# Altium PCB AC Voltage Controller.PcbDoc
Units mil, origin at the board's own origin, x right, y up, seen from the top; angles counter-clockwise.
Board outline 6040 x 4060 mil, 2 copper layers (L1, L4), stack 52.559 mil thick; 50 components, 37 nets, 228 pads, 75 vias.
Unrouted connection lines stored in the file: 4.
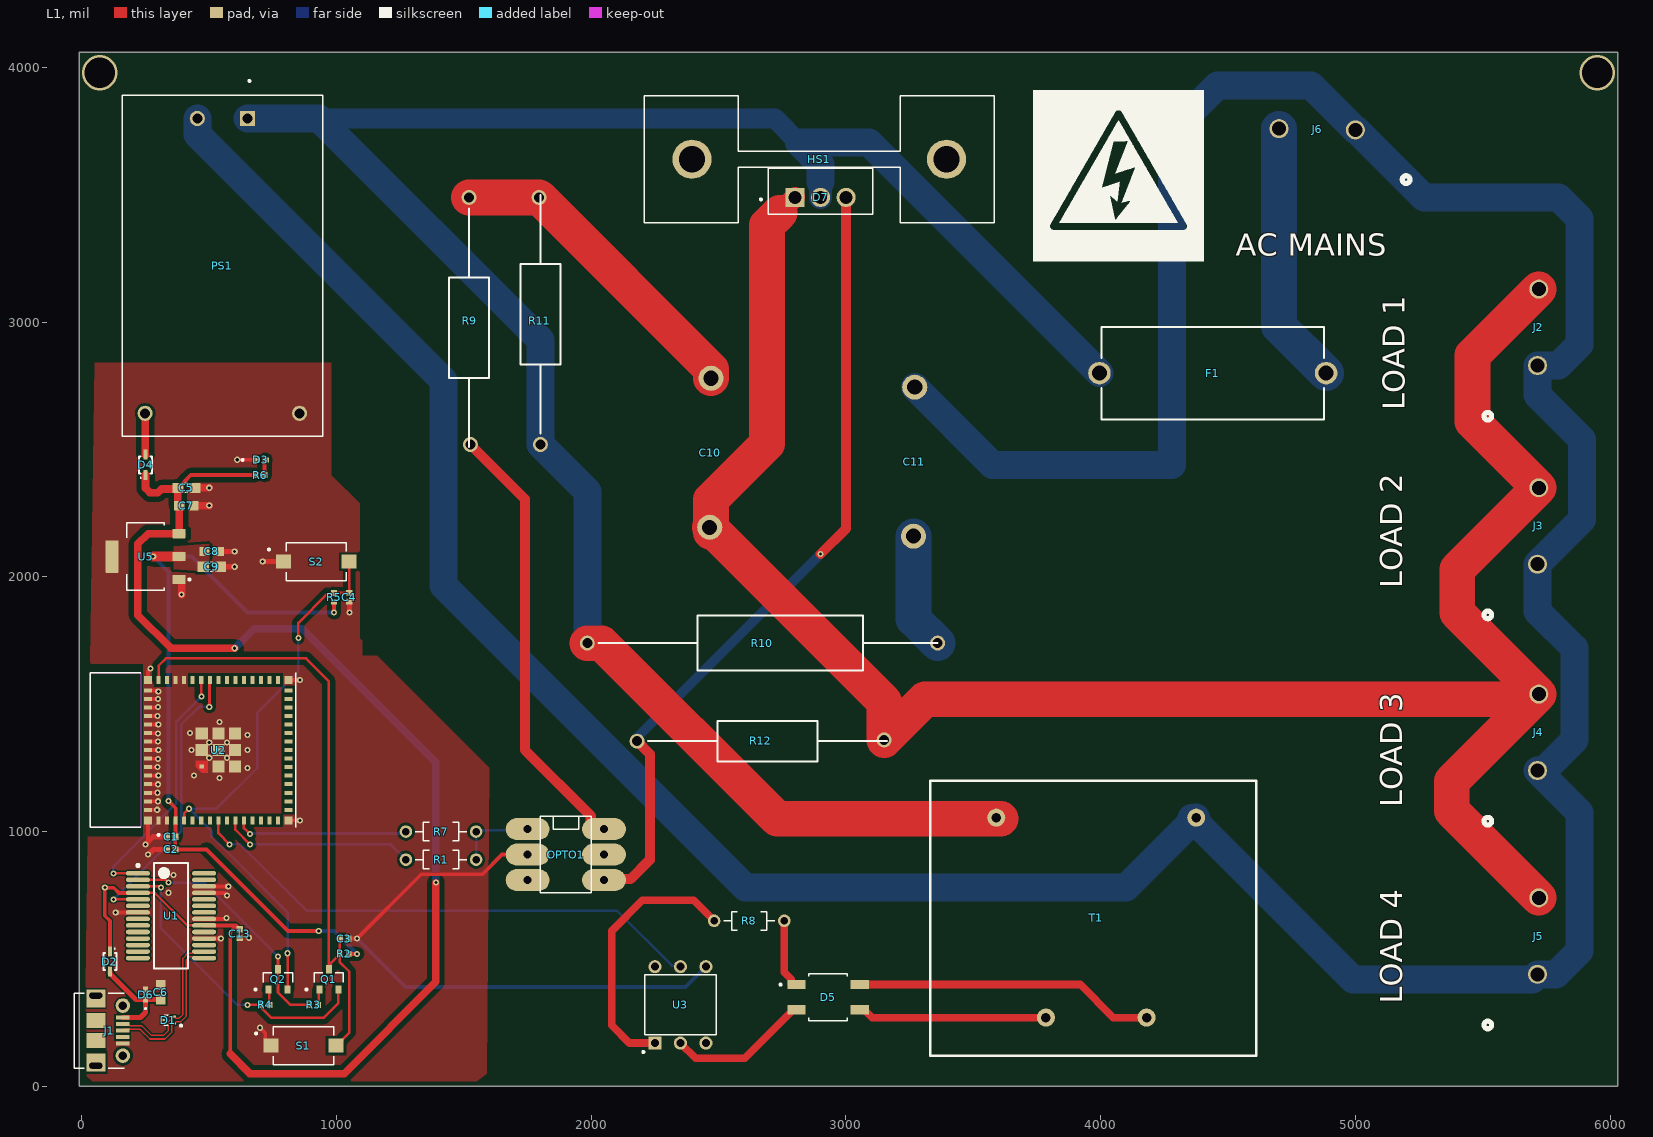
[diagram p0: L1 view]
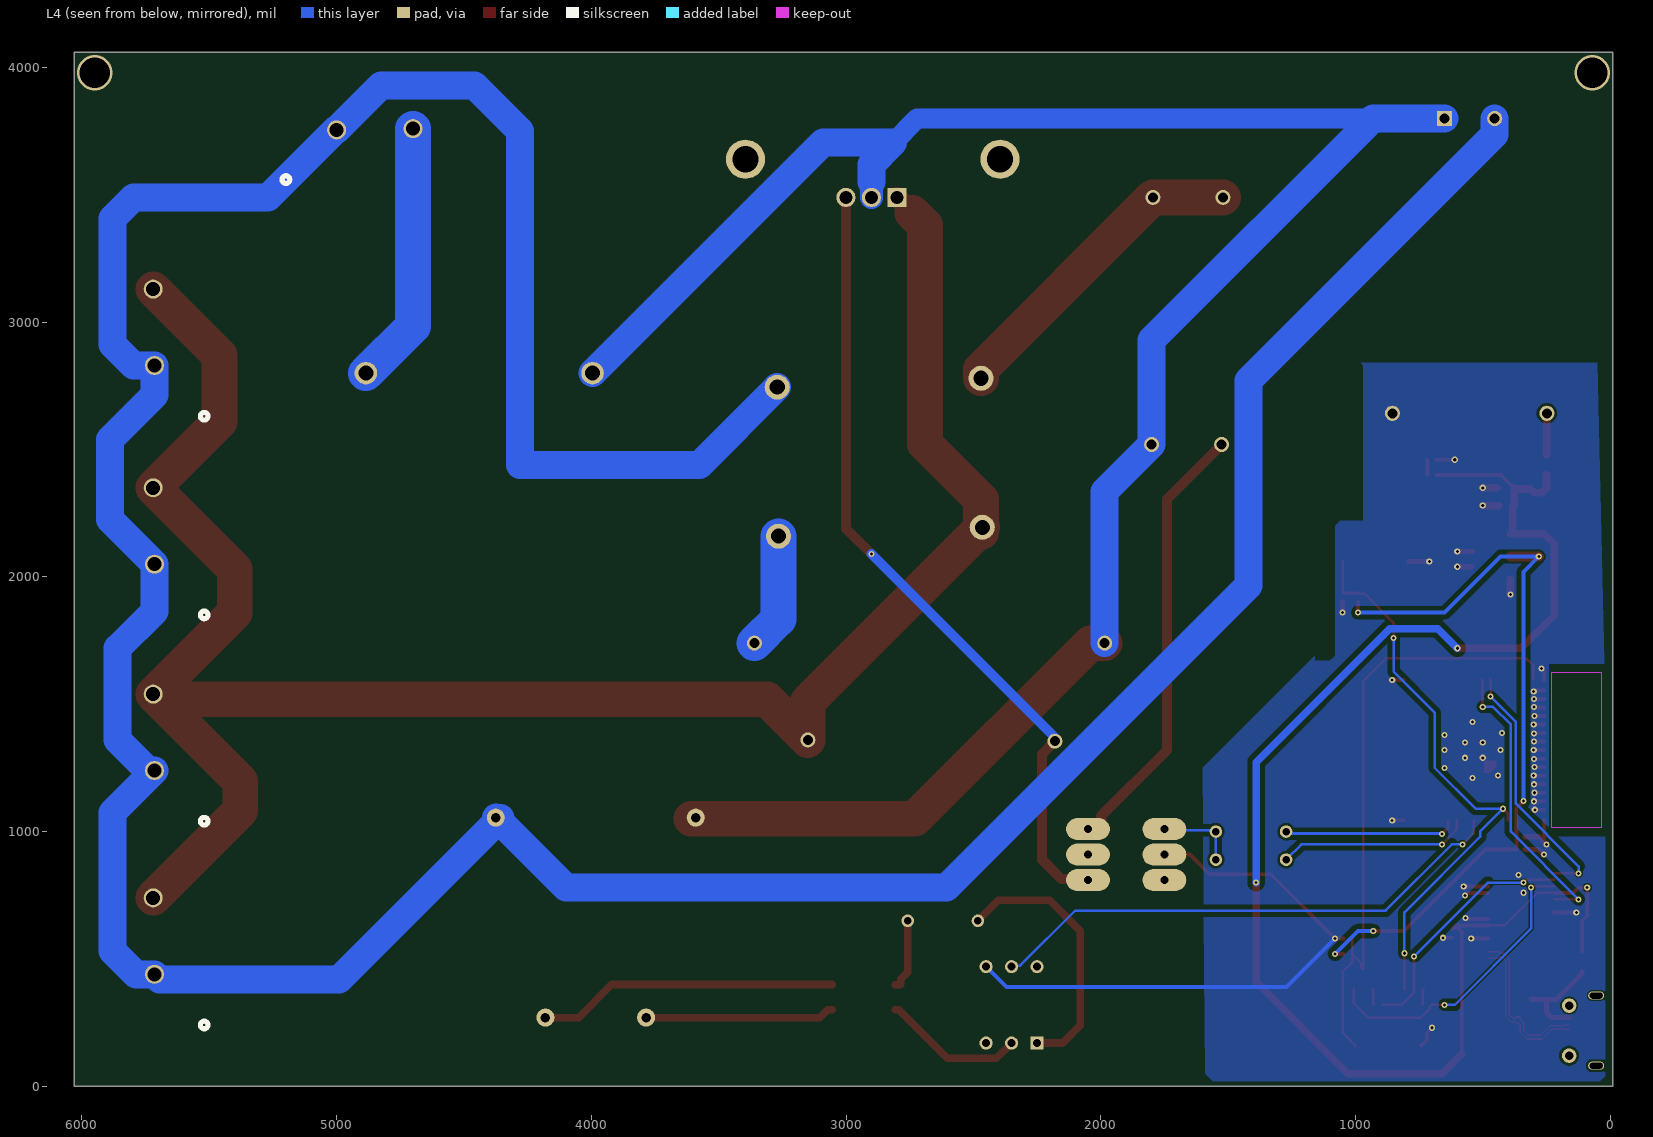
[diagram p1: L4 view, seen from below]
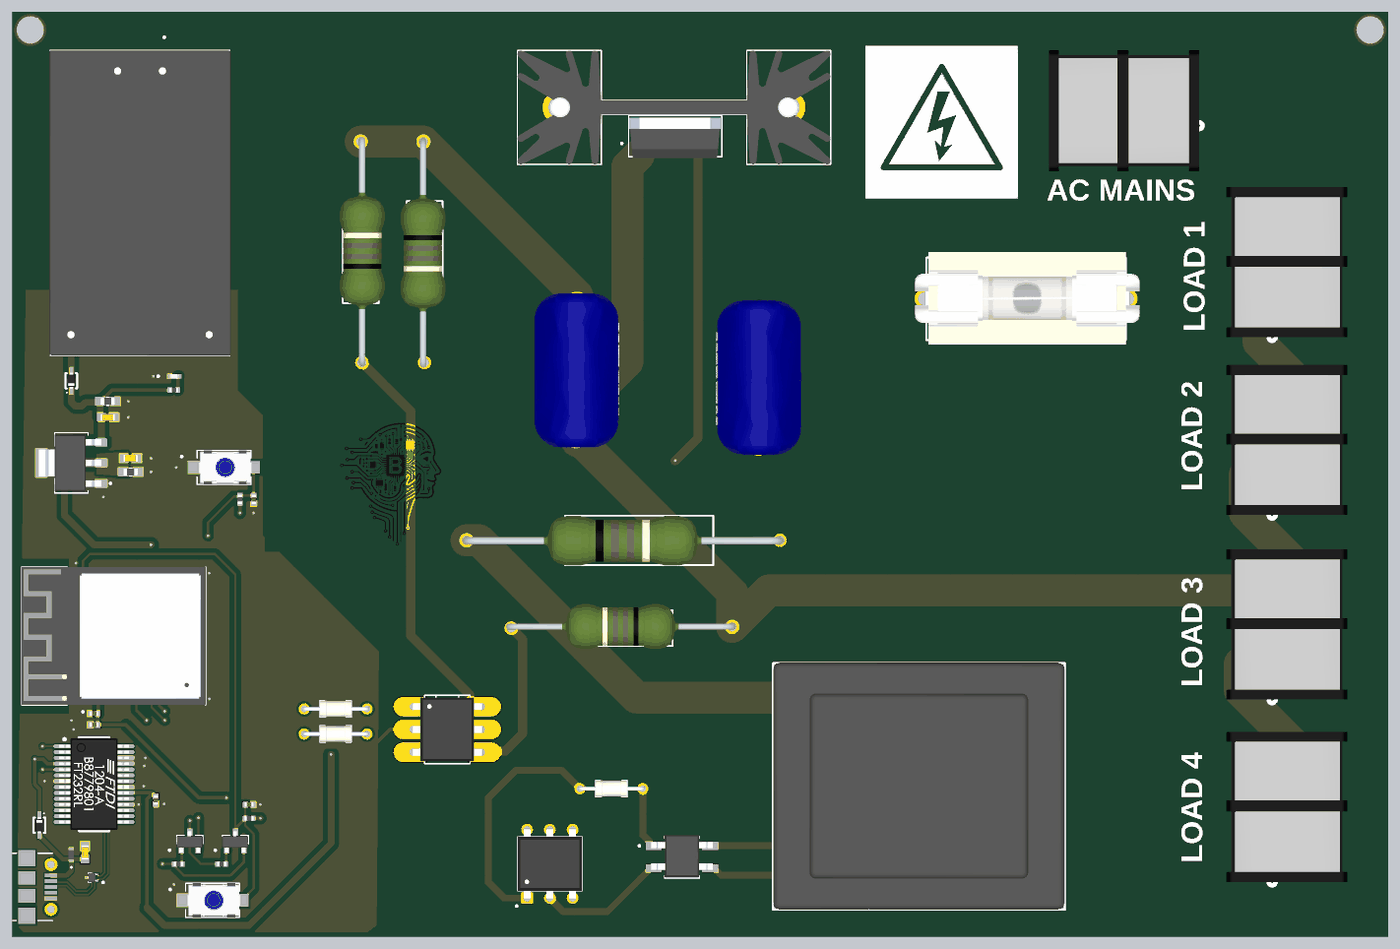
[diagram p2: 3D render of the assembled board from above, using the file's embedded part models]

## Layer stack, top to bottom
Top Solder: solder mask 0.4, Solder Resist, Dk 3.5
L1: signal copper 1.378
Dielectric 1: dielectric 49.803, FR-4, Dk 4.8
L4: signal copper 1.378
Bottom Solder: solder mask 0.4, Solder Resist, Dk 3.5

## Board outline
-10,0 -10,4060 6030,4060 6030,0

## Design rules (kind name [scope] priority, off if disabled: settings)
Clearance "optional resistors" [WithinRoom('Optional1') or WithinRoom('Optional2')] p1: gap=0 ignorepadtopadclearanceinfootprint=FALSE
Clearance SMALLER [WithinRoom('FTDI') or WithinRoom('usbc11') or WithinRoom('usbc22')] p2: gap=6 ignorepadtopadclearanceinfootprint=FALSE
Clearance DIFF_1 [InDifferentialPairClass('DIFF90')] p3: gap=8 ignorepadtopadclearanceinfootprint=FALSE
Clearance [All] p4: gap=10 ignorepadtopadclearanceinfootprint=FALSE except(5: SMDPad-THPad THPad-THPad; 6: Arc-THPad Track-THPad SMDPad-SMDPad; 20: Arc-Fill Arc-Poly Arc-Region Track-Fill Track-Poly Track-Region)
ComponentClearance r1r2 [InComponent('R1') vs InComponent('R2')] p1: gap=0 collisioncheckmode=3 verticalgap=0 showdistances=FALSE
ComponentClearance r12r16 [InComponent('R15') vs InComponent('R16')] p2: gap=0 collisioncheckmode=3 verticalgap=0 showdistances=FALSE
ComponentClearance r17r19 [InComponent('R17') vs InComponent('R19')] p3: gap=0 collisioncheckmode=3 verticalgap=0 showdistances=FALSE
DiffPairsRouting DIFF90 [InDifferentialPairClass('DIFF90')] p1: maxlimit=8.1 minlimit=8 mostfreqgap=8 toplayer_minwidth=6.03 toplayer_maxwidth=6.23 toplayer_prefwidth=6.03 bottomlayer_minwidth=6.03 bottomlayer_maxwidth=6.23 bottomlayer_prefwidth=6.03 maxuncoupledlength=500
HoleSize [All] p1: absolutevalues=TRUE maxlimit=200 minlimit=1 maxpercent=80.000 minpercent=20.000
MinimumSolderMaskSliver [All] p1: minsoldermaskwidth=0
PlaneConnect [All] p1: pad.planeconnectstyle=Relief pad.reliefexpansion=20 pad.reliefentries=4 pad.reliefconductorwidth=20 pad.reliefairgap=10 via.planeconnectstyle=Direct via.reliefexpansion=20 via.reliefentries=4 via.reliefconductorwidth=10 via.reliefairgap=10
PolygonConnect "no connect" [InNet('CON_ESP_USB_P') vs InNet('GND')] p1: connectstyle=NoConnect reliefconductorwidth=10 reliefentries=4 polygonreliefangle="90 Angle" airgapwidth=10
PolygonConnect [All] p2: connectstyle=Direct reliefconductorwidth=10 reliefentries=4 polygonreliefangle="90 Angle" airgapwidth=10
RoomDefinition FTDI [False] p1: confinementstyle=ConfineIn formatcopy=TRUE lockcomponents=FALSE outline 23.33,980 640,980 640,160 23.33,160
RoutingVias [All] p1: holewidth=12 width=24 viastyle="Through Hole" minholewidth=6 minwidth=6 maxholewidth=200 maxwidth=200
SolderMaskExpansion [All] p1: expansion=2 istentingtop=FALSE
SupplyNets "Schematic Supply Nets" [InNet('PH_F')] p1: voltage=0.000
SupplyNets "Schematic Supply Nets_6" [InNet('+3V3')] p2: voltage=0.000
SupplyNets "Schematic Supply Nets_3" [InNet('NE')] p3: voltage=0.000
SupplyNets "Schematic Supply Nets_5" [InNet('+5')] p4: voltage=0.000
SupplyNets "Schematic Supply Nets_2" [InNet('VUSB')] p5: voltage=0.000
SupplyNets "Schematic Supply Nets_4" [InNet('GND')] p6: voltage=0.000
Width [All] p1: maxlimit=200 minlimit=6 preferedwidth=20 minimp=50.000000 maximp=50.000000 favimp=50.000000
25 further rules are at their usual default settings.

## Classes and differential pairs
component class "Triac Drive": C10 C11 D5 D7 F1 HS1 J2 J3 J4 J5 J6 OPTO1 R1 R7 R8 R9 R10 R11 R12 T1 U3
differential pair class DIFF90: CON_ESP_USB ESP_USB FTDI USBCON1 USBCON2
differential pair USBCON1: +USBCON1_P -USBCON1_N

## Components (designator, comment, footprint, x,y, rotation, side; value= is the part's Value field where it differs from the comment)
C1 "0.1uF" CAPC1005X61N 350,980 r0 top
C2 "0.1uF" CAPC1005X61N 350,930 r0 top
C3 "0.1uF" CAPC1005X61N 1030,580 r0 top
C4 "0.1uF" CAPC1005X61N 1050,1920 r270 top
C5 "22uF" CAPC1608X90 410,2350 r0 top
C6 "10uF" CAPC1608X100N 310,370 r90 top
C7 "10uF" CAPC1608X100N 410,2280 r180 top
C8 "10uF" CAPC1608X100N 510,2100 r180 top
C9 "22uF" CAPC1608X90 510,2040 r0 top
C10 "10nF" PCBComponent_1#1 2605,2790 r270 top
C11 "10nF" PCBComponent_1#1 3130,2150 r90 top
C13 "0.1uF" CAPC1005X61N 620,600 r90 top
D1 "TPD2EUSB30DRTR" SOTFL35P100X50-3N 340,260 r180 top
D2 "Panasonic DB2J20900L Schottky Diode, 0.5A, 20V, 2.4ns, 2-Pin SMini2 F5 B" DIOM1712X07N 110,490 r270 top
D3 "RED" LED_APHHS1005LSECK/J3-PF 702.28,2460 r0 top
D4 "Panasonic DB2J20900L Schottky Diode, 0.5A, 20V, 2.4ns, 2-Pin SMini2 F5 B" DIOM1712X07N 250,2440 r90 top
D5 "MBS6H" DIOB_MBS6H 2930,350 r0 top
D6 "TVS" DIO_TPD1E05U06DPYR 250,360.32 r90 top
D7 "BTA16-600B" TO255P1040X460X1975-3 2799.61,3490 r0 top
F1 "696101000002" 696101000002 4440,2800 r180 top
HS1 "531002B02500-R" HSINK_531002B02500-R 2895,3640 r180 top
J1 "105017-0001" MOLEX_105017-0001 54.68,218.82 r270 top
J2 "OUT4" CONN_398800302_MOL 5520,2830 r90 top
J3 "OUT3" CONN_398800302_MOL 5520,2050 r90 top
J4 "OUT2" CONN_398800302_MOL 5520,1240 r90 top
J5 "OUT1" CONN_398800302_MOL 5520,440 r90 top
J6 "AC" CONN_398800302_MOL 5000,3560 r180 top
OPTO1 "MOC3022" MOC3022 1950,860 r0 top
PS1 "HLK-PM01" CONV_HLK-PM01 551.57,3221.26 r270 top
Q1 "SS8050-G" TRANS_SS8050-G 970,420 r90 top
Q2 "SS8050-G" TRANS_SS8050-G 770,420 r90 top
R1 "330" RESAD700W45L350D185 1410,890 r180 top
R2 "10K" RESC1005X35N 1030,520 r0 top
R3 "10K" RESC1005X35N 910,320 r0 top
R4 "10K" RESC1005X35N 720,320 r0 top
R5 "10K" RESC1005X35N 990,1920 r270 top
R6 "2K2" RESC1005X35N 700,2400 r180 top
R7 "330" RESAD700W45L350D185 1410,1000 r180 top
R8 "1.6k" RESAD700W45L350D185 2620,650 r0 top
R9 "360" RESAD2600W80L1000D400 1520,3490 r270 top
R10 "39" RESAD3850W80L1650D550 3500,1740 r180 top
R11 "2.4K" RESAD2600W80L1000D400 1800,2520 r90 top
R12 "330" RESAD2600W80L1000D400 2180,1355 r0 top
S1 "TS10-63-26-BE-250-SMT-TR" SW_TS10-63-26-BE-250-SMT-TR 870,160 r0 top
S2 "TS10-63-26-BE-250-SMT-TR" SW_TS10-63-26-BE-250-SMT-TR 920,2060 r0 top
T1 "PCB Transformer" PCBComponent_1#2 4610,1200 r90 top
U1 "FT232RL, Universal Asynchronous Receiver & Transmitter 3MBd, 28-Pin, SSOP" SOP65P780X200-28N 350,670 r0 top
U2 "ESP32-S3-MINI-1-N8" XCVR_ESP32-S3-MINI-1-N8 535.59,1320 r90 top
U3 "4N25" DIP762W50P254L712H400Q6N 2350,320 r90 top
U5 "AMS1117-3.3" SOT229P700X180-4N 250,2080 r90 top

## Footprints (in the part's own frame and the unit in brackets; to place one, negate y for a bottom-side part, rotate by r counter-clockwise, add the part's x,y. Pads: shape width x height; smd on the part's side, far side on the other; paste and mask are expansions set on the pad)
696101000002 [mm]
  round 2.25 hole 1.5: 1(-11.3,0) 2(11.3,0)
  silkscreen extent -11.1,-4.6 11.1,4.6, body extent -12.63,-5.21 12.37,5.09, height 13.34
CAPC1005X61N [mm]
  rect 0.6x0.64 smd paste+0 mask+0.102: 1(-0.426,0) 2(0.426,0)
  body extent -0.51,-0.26 0.51,0.26, height 0.61
CAPC1608X90 [mm]
  rect 1.1x1 smd: 1(-0.85,0) 2(0.85,0)
  silkscreen extent -0.15,-0.45 0.15,0.45, body extent -0.8,-0.4 0.8,0.4, height 0.9
CAPC1608X100N [mm]
  rect 1.01x0.93 smd paste+0 mask+0.102: 1(-0.709,0) 2(0.709,0)
  body extent -0.8,-0.4 0.8,0.4, height 1
CONN_398800302_MOL [mm]
  round 1.9 hole 1.4: 1(0,-4.953) 2(7.62,-5.08)
  silkscreen extent -5.44,-0.38 -4.67,0.38, body extent -5.06,-8.4 11.68,5.1, height 14.81
CONV_HLK-PM01 [mm]
  rect 1.508x1.508 / inner round 1.508 / far side rect 1.508x1.508 hole 1: 1(-14.7,2.5)
  round 1.508 hole 1: 2(-14.7,-2.5) 3(14.7,7.7) 4(14.7,-7.7)
  silkscreen extent -18.55,-10 17,10, body extent -17,-10.1 17,10.1, height 15
DIO_TPD1E05U06DPYR [mm]
  rect 0.6x0.5 smd: 1(-0.5,0) 2(0.5,0)
  silkscreen extent -1.47,-0.08 -1.33,0.07, body extent -0.5,-0.3 0.5,0.3, height 0.45
DIOB_MBS6H [mm]
  rect 1.8x0.9 smd: AC1(3.15,1.25) AC2(3.15,-1.25) NEG(-3.15,-1.25) POS(-3.15,1.25)
  silkscreen extent -4.85,-2.35 1.92,2.35, body extent -3.45,-2.22 3.45,2.48, height 2.71
DIOM1712X07N [mm] "Molded Diode, 2-Leads, Body 1.70x1.25mm, IPC Medium Density"
  rect 1x0.4 smd: 1(-1.016,0) 2(1.016,0)
  silkscreen extent -1.35,-0.65 0.85,0.65, body extent -0.9,-0.45 0.9,0.45, height 0.8
DIP762W50P254L712H400Q6N [mm]
  rect 1.308x1.308 / inner round 1.308 / far side rect 1.308x1.308 hole 0.8: 1(-3.81,2.54)
  round 1.308 hole 0.8: 2(-3.81,0) 3(-3.81,-2.54) 4(3.81,-2.54) 5(3.81,0) 6(3.81,2.54)
  silkscreen extent -4.8,-3.56 3,3.8, body extent -3.98,-3.56 3.98,3.56, height 4
HSINK_531002B02500-R [mm]
  round 3.9 hole 2.6: 1(-12.7,0) 2(12.7,0)
  silkscreen extent -17.46,-6.35 17.46,6.35, body extent -17.46,-6.35 17.46,6.35, height 25.4
LED_APHHS1005LSECK/J3-PF [mm]
  rect 0.7x0.5 smd mask+0.05: 1(-0.45,0) 2(0.45,0)
  silkscreen extent -1.9,-0.1 -1.7,0.1, body extent -0.5,-0.25 0.5,0.25, height 0.5
MOC3022 [mil]
  oval 172x86 hole 31.5 mask+4.02: 1_ANODE(-200,150) 2_CATHODE(-200,50) 3_NC(-200,-50) 4_MAIN_TERM(100,-50) 5_TRIAC_SUB(100,50) 6_MAIN_TERM(100,150)
  silkscreen extent -150,-100 50,200, body extent -207,-90 107,190, height 157
MOLEX_105017-0001 [mm]
  rect 0.4x1.35 smd: 1(-1.3,2.675) 2(-0.65,2.675) 3(0,2.675) 4(0.65,2.675) 5(1.3,2.675)
  round 1.45 hole 0.85: P$1(-2.5,2.7) P$2(2.5,2.7)
  rect 1.5x1.9 smd: P$8(-1,0) P$9(1,0)
  rect 1.8x1.9 smd: P$10(-3.2,0) P$11(3.2,0)
  oval 0.8x1.6 hole 0.6 slot 1.3 at 90 deg: P$12(-3.5,0) P$13(3.5,0)
  silkscreen extent -3.75,-2.15 3.75,2.85, body extent -3.99,-2.54 3.99,2.89, height 2.71
PCBComponent_1#1 [mm]
  round 2.5 hole 1.5: 1(0.254,-3.429) 2(15.113,-3.556)
  body extent -3.43,-14.15 18.89,7.12, height 23.19
PCBComponent_1#2 [mm]
  round 1.8 hole 0.95: 1(-3.683,25.908) 2(-3.683,5.969) 3(-23.622,20.955) 4(-23.622,10.922)
  silkscreen extent -27.43,0 0,32.51, body extent -27.43,0.01 0.08,32.52, height 24
RESAD700W45L350D185 [mm]
  round 1.258 hole 0.75: 1(-3.5,0) 2(3.5,0)
  silkscreen extent -2.55,-0.92 2.55,0.92, body extent -3.72,-0.92 3.72,0.92, height 1.84
RESAD2600W80L1000D400 [mm]
  round 1.5 hole 1: 1(0,0) 2(24.638,0.127)
  silkscreen extent 1.1,-2 24.9,2, body extent -0.66,-2.33 25.04,2.67, height 3.01
RESAD3850W80L1650D550 [mm]
  round 1.5 hole 1: 1(3.556,0) 2(38.5,0)
  silkscreen extent 3.56,-2.75 37.4,2.75, body extent 3.18,-2.71 38.98,2.79, height 3.77
RESC1005X35N [mm]
  rect 0.56x0.6 smd: 1(-0.435,0) 2(0.435,0)
  body extent -0.5,-0.25 0.5,0.25, height 0.35
SOP65P780X200-28N [mm] "SOP, 28-Leads, Body 10.20x5.30mm, Pitch 0.65mm, IPC Medium Density"
  oval 2.4x0.45 smd: 1(-3.3,4.225) 2(-3.3,3.575) 3(-3.3,2.925) 4(-3.3,2.275) 5(-3.3,1.625) 6(-3.3,0.975) 7(-3.3,0.325) 8(-3.3,-0.325) 9(-3.3,-0.975) 10(-3.3,-1.625) 11(-3.3,-2.275) 12(-3.3,-2.925) 13(-3.3,-3.575) 14(-3.3,-4.225) 15(3.3,-4.225) 16(3.3,-3.575) 17(3.3,-2.925) 18(3.3,-2.275) 19(3.3,-1.625) 20(3.3,-0.975) 21(3.3,-0.325) 22(3.3,0.325) 23(3.3,0.975) 24(3.3,1.625) 25(3.3,2.275) 26(3.3,2.925) 27(3.3,3.575) 28(3.3,4.225)
  silkscreen extent -3.42,-5.25 1.7,5.25, body extent -3.91,-5.1 3.91,5.1, height 2
SOT229P700X180-4N [mm]
  rrect15% 0.93x1.31 smd: 1(-2.29,-3.345) 2(0,-3.345) 3(2.29,-3.345)
  rrect15% 3.24x1.31 smd: 4(0,3.345)
  silkscreen extent -3.36,-4.47 3.36,1.86, body extent -3.15,-3.37 3.15,3.63, height 1.8
SOTFL35P100X50-3N [mm]
  rrect25% 0.46x0.2 smd: 1(-0.52,0.35) 2(-0.52,-0.35) 3(0.52,0)
  silkscreen extent -1.35,-0.5 0.4,0.65, body extent -0.51,-0.51 0.49,0.49, height 0.46
SW_TS10-63-26-BE-250-SMT-TR [mm]
  rect 1.5x1.4 smd: 1(-3.25,0) 2(3.25,0)
  silkscreen extent -4.82,-1.9 3,1.9, body extent -3.56,-1.9 3.84,1.9, height 2.2
TO255P1040X460X1975-3 [mm]
  rect 1.91x1.91 / inner round 1.91 / far side rect 1.91x1.91 hole 1.27: 1(0,0)
  round 1.91 hole 1.27: 2(2.55,0) 3(5.1,0)
  silkscreen extent -3.5,-1.7 7.75,2.9, body extent -2.58,-1.83 7.62,2.67, height 20.16
TRANS_SS8050-G [mm]
  rect 0.8x0.6 smd: 1(-1.01,0.95) 2(-1.01,-0.95) 3(1.01,0)
  silkscreen extent -1.11,-1.45 0.65,2.35, body extent -1.29,-1.42 1.11,1.47, height 1.14
XCVR_ESP32-S3-MINI-1-N8 [mm]
  rect 0.8x0.4 smd: 1(-7,5.95) 2(-7,5.1) 3(-7,4.25) 4(-7,3.4) 5(-7,2.55) 6(-7,1.7) 7(-7,0.85) 8(-7,0) 9(-7,-0.85) 10(-7,-1.7) 11(-7,-2.55) 12(-7,-3.4) 13(-7,-4.25) 14(-7,-5.1) 15(-7,-5.95) 31(7,-5.95) 32(7,-5.1) 33(7,-4.25) 34(7,-3.4) 35(7,-2.55) 36(7,-1.7) 37(7,-0.85) 38(7,0) 39(7,0.85) 40(7,1.7) 41(7,2.55) 42(7,3.4) 43(7,4.25) 44(7,5.1) 45(7,5.95)
  rect 0.4x0.8 smd: 16(-5.95,-7) 17(-5.1,-7) 18(-4.25,-7) 19(-3.4,-7) 20(-2.55,-7) 21(-1.7,-7) 22(-0.85,-7) 23(0,-7) 24(0.85,-7) 25(1.7,-7) 26(2.55,-7) 27(3.4,-7) 28(4.25,-7) 29(5.1,-7) 30(5.95,-7) 46(5.95,7) 47(5.1,7) 48(4.25,7) 49(3.4,7) 50(2.55,7) 51(1.7,7) 52(0.85,7) 53(0,7) 54(-0.85,7) 55(-1.7,7) 56(-2.55,7) 57(-3.4,7) 58(-4.25,7) 59(-5.1,7) 60(-5.95,7)
  rect 1.2x1.2 smd: 61(0,0) 61_2(0,1.65) 61_3(1.65,1.65) 61_4(1.65,0) 61_5(1.65,-1.65) 61_6(0,-1.65) 61_7(-1.65,-1.65) 61_8(-1.65,0)
  rect 0.4x0.4 smd paste-1 mask+0: 61_1(-1.65,1.65)
  rect 0.8x0.8 smd: 62(-7,7) 63(-7,-7) 64(7,-7) 65(7,7)
  L1 region: -1.05,1.05 -2.25,1.05 -2.25,1.65 -1.65,2.25 -1.05,2.25
  Keep-Out Layer region: 7.7,7.725 -7.7,7.725 -7.7,12.775 7.7,12.775
  Keep-Out Layer region: 7.7,7.725 -7.7,7.725 -7.7,12.775 7.7,12.775
  silkscreen extent -8.55,-7.73 7.7,12.78, body extent -7.7,-7.71 7.7,12.79, height 2.56

## Part data
C1 C2 C3 C4 C13: library part VJ0402D130GXCAP, "CAP CER 13PF 200V C0G/NP0 0402", Package="1005 Vishay Vitramon", Check_prices=https://www.snapeda.com/parts/VJ0402D130GXCAP/Vishay/view-part/?ref=eda, MF="Vishay Vitramon", MP=VJ0402D130GXCAP, SnapEDA_Link=https://www.snapeda.com/parts/VJ0402D130GXCAP/Vishay/view-part/?ref=snap
C5 C9: library part CC0603MRX5R6BB226, "22 ÂµF Â±20% 10V Ceramic Capacitor X5R 0603 (1608 Metric)", Package="0603 Yageo", Check_prices=https://www.snapeda.com/parts/CC0603MRX5R6BB226/Yageo/view-part/?ref=eda, MF=Yageo, MP=CC0603MRX5R6BB226, SnapEDA_Link=https://www.snapeda.com/parts/CC0603MRX5R6BB226/Yageo/view-part/?ref=snap
C6 C7 C8: library part C1608X5R1E106M080AC, "10 ÂµF Â±20% 25V Ceramic Capacitor X5R 0603 (1608 Metric)", Package="1608-2 TDK", Check_prices=https://www.snapeda.com/parts/C1608X5R1E106M080AC/TDK/view-part/?ref=eda, MF="TDK Corporation", MP=C1608X5R1E106M080AC, SnapEDA_Link=https://www.snapeda.com/parts/C1608X5R1E106M080AC/TDK/view-part/?ref=snap
C10 C11: library part "Capacitor 10nF 630v"
D1: "2-channel ESD solution for SuperSpeed USB 3.0 interface 3-SOT-9X3 -40 to 85", Package="SOT-9X3-3 Texas Instruments", Availability=Warning, MF="Texas Instruments", MP=TPD2EUSB30DRTR, Price=None, Purchase-URL=https://pricing.snapeda.com/search/part/TPD2EUSB30DRTR/?ref=eda, SnapEDA_Link=https://www.snapeda.com/parts/TPD2EUSB30DRTR/Texas%20Instruments/view-part/189118/?ref=snap
D2 D4: library part "Schottky Diode, 0.5A, 20V, 2.4ns, 2-Pin SMini2 F5 B", Manufacturer=Panasonic, Manufacturer Part No.=DB2J20900L, Maximum Continuous Forward Current=0.5A, Peak Reverse Repetitive Voltage=20V, Created By="R Kanjee", Datasheet=http://docs-europe.electrocomponents.com/webdocs/1398/0900766b813986b3.pdf, Date Created="1 March 2015", RS Stock No.=713-2703
D3: library part APHHS1005LSECK/J3-PF, "Red 625nm LED Indication - Discrete 1.8V 0402 (1005 Metric)", Package="0402 Kingbright Corporation", Check_prices=https://www.snapeda.com/parts/APHHS1005LSECK/J3-PF/Kingbright/view-part/?ref=eda, MF=Kingbright, MP=APHHS1005LSECK/J3-PF, SnapEDA_Link=https://www.snapeda.com/parts/APHHS1005LSECK/J3-PF/Kingbright/view-part/?ref=snap
D5 F1 U2: Package=None, Availability=Unavailable, Price=None
  D5: MF="{'manufacturer': u'Taiwan Semiconductor Corporation'}", MP=MBS6H
  F1: MF="{'manufacturer': u'W\xfcrth Elektronik'}", MP=696101000002
  U2: MF="{'manufacturer': u'Espressif Systems'}", MP=ESP32-S3-MINI-1-N8
D6: library part TPD1E10B06DPYT, "Single-channel ESD in 0402 package with 10pF capacitance and 6-V breakdown 2-X1SON -40 to 125", Package="X1SON-2 Texas Instruments", Check_prices=https://www.snapeda.com/parts/TPD1E10B06DPYT/Texas%20Instruments/view-part/231963/?ref=eda, Digi-Key_Part_Number=296-41842-1-ND, MF="Texas Instruments", MP=TPD1E10B06DPYT, Purchase-URL=https://pricing.snapeda.com/search/part/TPD1E10B06DPYT/?ref=eda, SnapEDA_Link=https://www.snapeda.com/parts/TPD1E10B06DPYT/Texas%20Instruments/view-part/231963/?ref=snap
D7: "TRIAC Alternistor - Snubberless 600 V 16 A Through Hole TO-220", Package="TO-220-3 STMicroelectronics", Check_prices=https://www.snapeda.com/parts/BTA16-600B/STMicroelectronics/view-part/?ref=eda, MF=STMicroelectronics, MP=BTA16-600B, SnapEDA_Link=https://www.snapeda.com/parts/BTA16-600B/STMicroelectronics/view-part/?ref=snap
HS1: "Heatsink To-220 2 Holes 2 Pins 1.38 X0.50 X1.00", Package="Heatsink Jameco Valuepro", Check_prices=https://www.snapeda.com/parts/531002B02500-R/Jameco+Benchpro/view-part/?ref=eda, MF="Jameco Valuepro", MP=531002B02500-R, SnapEDA_Link=https://www.snapeda.com/parts/531002B02500-R/Jameco+Benchpro/view-part/?ref=snap
J1: "ÐŸÐ¾Ð´ÐºÐ».; Ð¿ÐµÑ€ÐµÐ´Ð°Ñ‡Ð° Ð´Ð°Ð½Ð½Ñ‹Ñ…; USB; Ð¿Ñ€Ð¸ÐµÐ¼; Micro; Ñ‚Ð¸Ð¿ B; Ð½Ð¸Ð¶Ð½ÐµÐµ ÐºÑ€ÐµÐ¿Ð»ÐµÐ½Ð¸Ðµ, SMT, Ñ Ð¿Ñ€Ð¸Ð¿Ð¾ÐµÐ¼, Ð±ÐµÐ· ÑÐ²Ð¸Ð½Ñ†Ð°", Package=None, Check_prices=https://www.snapeda.com/parts/105017-0001/Molex/view-part/?ref=eda, MF=Molex, MP=105017-0001, SnapEDA_Link=https://www.snapeda.com/parts/105017-0001/Molex/view-part/?ref=snap
J2 J3 J4 J5 J6: library part 398800302, "2 Position Wire to Board Terminal Block Horizontal with Board 0.200 (5.08mm) Through Hole", Package=None, Check_prices=https://www.snapeda.com/parts/0398800302/Molex/view-part/?ref=eda, MF=Molex, MP=0398800302, SnapEDA_Link=https://www.snapeda.com/parts/0398800302/Molex/view-part/?ref=snap
OPTO1: "Optoisolator Triac Output 5000Vrms 1 Channel 6-DIP", Package="DIP-6 Isocom Components", Check_prices=https://www.snapeda.com/parts/MOC3022/Isocom/view-part/?ref=eda, MF="Isocom Components", MP=MOC3022, SnapEDA_Link=https://www.snapeda.com/parts/MOC3022/Isocom/view-part/?ref=snap
PS1: "The HLK-PM01 is a small size low cost AC to DC converter which can take in 110V/220V AC at 50/60 Hz and give 5V 3W output. The module is can be used in designs which run on 5V and needs to be powered form the AC mains.", Package=None, Check_prices=https://www.snapeda.com/parts/hlk-pm01/Hi-link/view-part/?ref=eda, MF=Hi-link, MP=hlk-pm01, SnapEDA_Link=https://www.snapeda.com/parts/hlk-pm01/Hi-link/view-part/?ref=snap
Q1 Q2: "Bipolar (BJT) Transistor NPN 25 V 1.5 A 100MHz 300 mW Surface Mount SOT-23-3", Package=None, Check_prices=https://www.snapeda.com/parts/SS8050G/Comchip/view-part/?ref=eda, Digi-Key_Part_Number=641-1790-2-ND, MF=Comchip, MP=SS8050G, SnapEDA_Link=https://www.snapeda.com/parts/SS8050G/Comchip/view-part/?ref=snap
R1 R7 R8: library part 2-1623927-3, "Carbon Film Resistors - Through Hole 1K Ohm 5% 1/4W Res Carbon Film", Package=None, Power_Rating=".25 W", Resistance=1K, Tolerance=5%, Voltage_Rating="200 V", Check_prices=https://www.snapeda.com/parts/2-1623927-3/TE+Connectivity/view-part/?ref=eda, EU_RoHS_Compliance=Compliant, MF="TE Connectivity", MP=2-1623927-3, SnapEDA_Link=https://www.snapeda.com/parts/2-1623927-3/TE+Connectivity/view-part/?ref=snap
R2 R3 R4 R5: library part RT0402FRE075K1L, "Res Thin Film 0402 10K Ohm 1% 0.063W(1/16W) Â±50ppm/C Molded SMD Paper T/R", Package="1005 Yageo", Check_prices=https://www.snapeda.com/parts/RT0402FRE075K1L/Yageo/view-part/?ref=eda, MF=Yageo, MP=RT0402FRE075K1L, SnapEDA_Link=https://www.snapeda.com/parts/RT0402FRE075K1L/Yageo/view-part/?ref=snap
R6: library part RT0402FRE075K1L, "Res Thin Film 0402 2K2 Ohm 1% 0.063W(1/16W) Â±50ppm/C Molded SMD Paper T/R", Package="1005 Yageo", Check_prices=https://www.snapeda.com/parts/RT0402FRE075K1L/Yageo/view-part/?ref=eda, MF=Yageo, MP=RT0402FRE075K1L, SnapEDA_Link=https://www.snapeda.com/parts/RT0402FRE075K1L/Yageo/view-part/?ref=snap
R9 R12: library part EMC2-47RKI, "RES 360 OHM 2W 10% AXIAL", Package=None, Check_prices=https://www.snapeda.com/parts/EMC2-47RKI/TT+Electronics%252FWelwyn/view-part/?ref=eda, MF="TT Electronics/Welwyn", MP=EMC2-47RKI, SnapEDA_Link=https://www.snapeda.com/parts/EMC2-47RKI/TT+Electronics%252FWelwyn/view-part/?ref=snap
R10: library part PCF1C3R3K, "3.3 Ohms Â±10% 1W Through Hole Resistor Axial Automotive AEC-Q200, Flame Proof, Safety, Non-Inductive, Pulse Withstanding Ceramic", Package=None, Check_prices=https://www.snapeda.com/parts/PCF1C3R3K/KOA+Speer/view-part/?ref=eda, MF="KOA Speer", MP=PCF1C3R3K, SnapEDA_Link=https://www.snapeda.com/parts/PCF1C3R3K/KOA+Speer/view-part/?ref=snap
R11: library part EMC2-47RKI, "RES 2.4K OHM 2W 10% AXIAL", Package=None, Check_prices=https://www.snapeda.com/parts/EMC2-47RKI/TT+Electronics%252FWelwyn/view-part/?ref=eda, MF="TT Electronics/Welwyn", MP=EMC2-47RKI, SnapEDA_Link=https://www.snapeda.com/parts/EMC2-47RKI/TT+Electronics%252FWelwyn/view-part/?ref=snap
S1 S2: "6.1 x 3.8 mm, 2.6 mm Actuator Height, 250 gf, Surface Mount, SPST, Tactile Switch", Package=None, Check_prices=https://www.snapeda.com/parts/TS10-63-26-BE-250-SMT-TR/Same+Sky/view-part/?ref=eda, MF="Same Sky", MP=TS10-63-26-BE-250-SMT-TR, SnapEDA_Link=https://www.snapeda.com/parts/TS10-63-26-BE-250-SMT-TR/Same+Sky/view-part/?ref=snap
T1: library part EI-30
U1: library part "FT232RL USB to UART, Universal Asynchronous Receiver & Transmitter 3MBd, 28-Pin, SSOP", Manufacturer="FTDI Chip", Manufacturer Part No.=FT232RL, Creator="R Kanjee", Date Created="03 March 2015", Pin Count=28, RS Stock No.=406-580
U3: "Optoisolator, Analog, 6-Pin DIP, Transistor, w/Base Connection", Package="DIP-6 Everlight Electronics CO., LTD", Check_prices=https://www.snapeda.com/parts/4N25/Vishay/view-part/?ref=eda, MF="Vishay Semiconductor", MP=4N25, SnapEDA_Link=https://www.snapeda.com/parts/4N25/Vishay/view-part/?ref=snap
U5: "Linear Voltage Regulator IC Positive Fixed 1 Output 1A SOT-223-3L", Package="SOT-223-3L UMW", Check_prices=https://www.snapeda.com/parts/AMS1117-3.3/UMW/view-part/?ref=eda, MF=UMW, MP=AMS1117-3.3, SnapEDA_Link=https://www.snapeda.com/parts/AMS1117-3.3/UMW/view-part/?ref=snap

## Via types
v1: diameter 24, hole 12, L1 to L4, tented both sides, 73 vias
v2: diameter 140, hole 120, L1 to L4, 2 vias

## Nets (pads, with @x,y where several pads share a name; then routed paths per layer and width w, separated by ;. In a path a pad name is that pad's centre, name@x,y a point inside that pad or via, vN(x,y) a via of type N, cw(c..) or ccw(c..) an arc to the next point about the centre after c; other vN are vias at no path point)
+3V3: C1.2 C2.2 C8.2 C9.1 R2.2 R5.2 U2.3 U5.2 | length 3058.8
  L1 w15: v1(340,1120) 368.27,1091.73 U2.3 367.89,1044.04 367.89,981.12 C1.2 C2.2 489.32,930 809.32,610 v1(930,610) ; v1(990,1860) R5.2 ; R2.2 v1(1080,520)
  L1 w40: v1(280,2080) U5.2@391.69,2080
  L4 w15: v1(340,1120) 340,2020 v1(280,2080) 430,2080 650,1860 v1(990,1860) ; v1(930,610) 990,610 v1(1080,520)
+5: C5.1 C7.2 C13.2 D2.1 D4.1 R6.2 U1.4 U1.20 U5.3 | length 5879
  L1 w10: U1.4 286.02,759.57 413.98,631.61 U1.20
  L1 w15: D2.1 110,649.87 90,669.87 v1(90,780) 125,780 145.44,759.57 U1.4 ; C5.1 378.5,2350 404.31,2375.81 404.31,2376.93 427.38,2400 R6.2 ; U1.20 605.16,631.61 C13.2@614.9,621.87 ; 582.4,127.6 582.4,605.39 598.88,621.87 C13.2@614.9,621.87 ; C13.2 619.21,616.77 614.9,621.08 C13.2@614.9,621.87
  L1 w30: D4.1 250,2347.57 267.57,2330 297.57,2330 312.89,2345.31 371.85,2345.31 C5.1 376.54,2283.98 380.51,2280 C7.2 382.09,2173.46 385.39,2170.16 391.69,2170.16 260.16,2170.16 220,2130 220,1850 350,1720 v1(600,1720) ; 582.4,127.6 660,50 1030,50 1390,410 v1(1390,800)
  L4 w30: v1(600,1720) 677,1797 865.33,1797 1390,1272.33 v1(1390,800)
DTR: Q2.3 R3.1 U1.2 | length 958.7
  L1 w10: U1.2 329.25,810.75 v1(340,800) ; v1(770,510) Q2.3 770,368.87 818.87,320 R3.1
  L4 w10: v1(340,800) 480,800 v1(770,510)
EN: C3.1 Q1.3 R2.1 S1.2 U2.45 | length 2439.9
  L1 w10: U2.45 301.34,1651.34 330,1680 880,1680 970,1590 Q1.3 976.81,466.57 976.81,483.15 1012.87,519.21 R2.1 ; S1.2 999.92,160 1022.48,182.56 1022.48,184.53 1050,212.05 1050,450 1013.05,486.95 1013.05,579.82 C3.1
FIRE_TIME: U2.5
GND: C1.1 C2.1 C3.2 C4.2 C5.2 C6.2 C7.1 C8.1 C9.2 C13.1 D1.3 D3.1 D6.2 J1.5 OPTO1.2_CATHODE PS1.3 S1.1 S2.1 U1.7 U1.18 U1.21 U1.25 U1.26 U2.1 U2.2 U2.42 U2.43 U2.46 U2.47 U2.48 U2.49 U2.50 U2.51 U2.52 U2.53 U2.54 U2.55 U2.56 U2.57 U2.58 U2.59 U2.60 U2.61 U2.61_1 U2.61_2 U2.61_3 U2.61_4 U2.61_5 U2.61_6 U2.61_7 U2.61_8 U2.62 U2.63 U2.64 U2.65 U3.4 U5.1 | length 4368
  L1 w15: v1(132.8,682.8) U1.7 ; v1(250,950) 250,952.44 260,962.44 U2.62 ; U2.60 v1(295.75,1085.75) ; U2.59 v1(299.21,1119.21) ; U2.58 v1(297.32,1152.68) ; U2.57 260.11,1186.03 299.47,1186.03 v1(299.58,1185.93) ; U2.56 299.61,1219.61 v1(300,1220) ; U2.55 v1(296.93,1253.07) ; U2.54 260.37,1286.16 297.47,1286.16 v1(298.14,1285.49) ; U2.53 v1(300,1320) ; U2.52 260.07,1353.39 299.22,1353.39 v1(299.29,1353.32) ; U2.51 260.37,1386.56 297.64,1386.56 v1(298.85,1385.34) ; U2.50 260.2,1420.2 299.8,1420.2 v1(300,1420) ; U2.49 v1(296.14,1453.86) ; U2.48 v1@297.32,1487.32 ; U2.47 v1(299.21,1520.79) ; U2.46 293.31,1554.25 297.56,1550 v1(300,1550) ; U2.65 260,1630 v1(270,1640) ; U1.18 v1(545.4,580.43) ; U1.21 560.86,657.2 564.77,661.11 v1(567.2,661.11) ; U1.25 560.43,759.57 v1(570,750) ; U1.26 v1(574.84,785.16) ; v1(610,2460) D3.1 ; C13.1 v1(656.77,583.23) ; v1(700,230) 720.02,209.98 720.02,180.06 740.08,160 S1.1 ; U2.63 v1(855.59,1044.41) ; U2.64 v1(855.59,1595.59) ; C3.2 v1(1080,580) 1332.5,832.5 1572.5,832.5 1650,910 OPTO1.2_CATHODE
  L1 w20: v1(250,950) 280,980 C1.1 ; v1(260,910) 261.08,910 281.08,930 C2.1 ; C8.1 v1(600,2100) ; C9.2 v1(600,2040) ; v1(710,2060) S2.1 ; v1(1050,1860) C4.2
  L1 w30: v1@391.69,1930.85 U5.1@391.69,1989.84 ; C7.1 v1(500,2280) ; C5.2 v1(500,2350)
  L4 w15: v1(1080,580) 1270,390 2370,390 U3.4
  other v1: 340,760 360,830 540,1210 440,1220 650,1250 500,1290 570,1290 430,1320 650,1320 500,1350 570,1350 650,1380 425.21,1386.55 540,1430 298.66,1488.66 390.85,1930.85
IO0: C4.1 Q2.2 R5.1 S2.2 U2.4 | length 2267.6
  L1 w10: U2.4 401.73,1071.73 v1(420,1090) ; Q2.2 v1(807.4,522.6) ; v1(850,1760) 850,1820 963.19,1933.19 986.06,1933.19 R5.1 990.18,1936.95 1049.82,1936.95 C4.1 1050,2057.95 S2.2
  L4 w10: v1(807.4,522.6) 807.4,682.6 510,980 510,1000 v1(420,1090) 528.18,1090 689.09,1250.91 689.09,1467.28 850,1628.18 v1(850,1760)
NE: C11.2 J2.1 J3.1 J4.1 J5.1 J6.1 PS1.2 T1.2 | length 15304.5
  L4 w110: PS1.2 453.15,3736.85 1419.47,2770.53 1419.47,1966.29 2605.76,780 4100,780 T1.2 ; C11.2 3575,2440 4280,2440 4280,3751.42 4458.58,3930 4825,3930 J6.1 ; T1.2@4356.6,1053.4 4990,420 5695,420 J5.1 5787.99,440 5880,532.01 5880,1075 J4.1 5740,1240 5860,1360 5860,1720 5715,1865 J3.1 5890,2225 5890,2540 5715,2715 J2.1 5797.99,2830 5880,2912.01 5880,3407.99 5797.99,3490 5270,3490 J6.1@5002.5,3757.5
NetC10_1: C10.1 R9.1 R11.2 | length 1264.6
  L1 w140: R9.1 R11.2 2470,2815 C10.1
NetC10_2: C10.2 D7.1 J2.2 J3.2 J4.2 J5.2 R12.2 | length 8339.9
  L1 w80: 2740,3430.39 D7.1
  L1 w140: C10.2 3150,1510 R12.2 3310,1520 J4.2@5700,1520 ; C10.2@2470,2175.48 2470,2302.72 2690,2522.72 2690,3380.39 2740,3430.39 ; J5.2 5377.99,1082.01 5377.99,1197.99 J4.2 5400,1860 5400,2030 J3.2 5460,2610 5460,2870 J2.2
NetC11_1: C11.1 R10.1 | length 459.4
  L4 w140: C11.1 3265,1835 R10.1
NetD3_2: D3.2 R6.1 | length 61.5
  L1 w15: R6.1 717.13,2457.66 719.47,2460 D3.2
NetD4_2: D4.2 PS1.4 | length 163.2
  L1 w30: PS1.4 249.21,2641.73 249.21,2480.79 D4.2
NetD5_AC1: D5.AC1 T1.4 | length 1180.2
  L1 w30: D5.AC1 3054.8,400 3920,400 4050,270 T1.4
NetD5_AC2: D5.AC2 T1.3 | length 743.7
  L1 w30: D5.AC2 3071.73,300.79 3102.52,270 T1.3
NetD5_NEG: D5.NEG U3.2 | length 559.9
  L1 w30: U3.2 2410,110 2602.05,110 2792.83,300.79 D5.NEG
NetD5_POS: D5.POS R8.2 | length 281.1
  L1 w30: R8.2 2757.8,447.4 2785.55,419.65 2785.55,401.93 2788.27,399.21 D5.POS
NetD7_3: D7.3 OPTO1.4_MAIN_TERM R12.1 | length 3173.7
  L1 w40: OPTO1.4_MAIN_TERM 2054.33,814.33 2154.33,814.33 2230,890 2230,1305 R12.1 ; v1(2900,2090) 3000.39,2190.39 D7.3
  L4 w40: R12.1 2183.65,1358.65 2183.65,1373.65 v1(2900,2090)
NetHS1_1: 
NetOPTO1_1_ANODE: OPTO1.1_ANODE R1.1 R7.1 | length 316.3
  L4 w10: R1.1 R7.1 1552.8,1005 1745,1005 OPTO1.1_ANODE
NetOPTO1_6_MAIN_TERM: OPTO1.6_MAIN_TERM R9.2 | length 1745.4
  L1 w40: R9.2 1740,2305 1740,1320 1998.2,1061.8 1998.2,1031.25 2019.45,1010 OPTO1.6_MAIN_TERM
NetQ1_1: Q1.1 R3.2 | length 62.5
  L1 w10: R3.2 929.86,322.74 929.86,377.5 Q1.1
NetQ2_1: Q2.1 R4.2 | length 62.1
  L1 w10: Q2.1 734.86,377.97 734.86,322.26 R4.2
NetR8_1: R8.1 U3.1 | length 1054
  L1 w30: U3.1 2150,170 2080,240 2080,610 2200,730 2402.2,730 R8.1
PH: F1.1 J6.2 | length 1036.6
  L4 w140: J6.2 4700,2984.88 F1.1
PH_F: D7.2 F1.2 PS1.1 R10.2 R11.1 T1.1 | length 8700.2
  L1 w140: R10.2 2040,1740 2730,1050 T1.1@3607.82,1050
  L4 w80: PS1.1@645.37,3800 930,3800 2720,3800 2815,3705
  L4 w90: D7.2 2900,3551.07
  L4 w110: PS1.1 930,3800 1800,2930 R11.1 1984.25,2335.75 R10.2 ; 2900,3551.07 2900,3620 2815,3705 3090.12,3705 F1.2
RTS: Q1.2 R4.1 U1.3 | length 1176.8
  L1 w10: U1.3 304.84,785.16 v1(310,780) ; v1(650,320) R4.1 708.9,313.98 708.9,304.18 743.08,270 950,270 1007.4,327.4 Q1.2
  L4 w10: v1(310,780) 310,620 610,320 v1(650,320)
RX: U1.1 U2.40 | length 999.7
  L1 w10: v1(123.66,836.34) U1.1 ; U2.40 469.33,1594.92 469.33,1530.67 v1(470,1530)
  L4 w10: v1(123.66,836.34) 123.66,863.66 370,1110 370,1430 v1(470,1530)
SCL: U2.19
SDA: U2.18
TRIGGER1: R1.2 U2.10 | length 755.3
  L1 w10: U2.10 602.52,1007.48 v1(660,950)
  L4 w10: v1(660,950) 1212.2,950 R1.2
TRIGGER2: R7.2 U2.11 | length 680.7
  L1 w10: U2.11 635.98,1014.02 v1(660,990)
  L4 w10: v1(660,990) 662.68,992.68 1264.88,992.68 R7.2
TX: U1.5 U2.39 | length 1137.8
  L1 w10: v1(123.98,733.98) U1.5 ; v1(500,1490) 501.06,1491.06 501.06,1594.53 U2.39
  L4 w10: v1(123.98,733.98) 390,1000 390,1420 460,1490 v1(500,1490)
USBCON1_N: D1.2 J1.2 U1.16 | length 633.4
  L1 w6.03: J1.2 164.86,239.55 186.17,239.55 187.09,238.63 234.17,238.63 272.88,199.92 320.08,199.92 339.6,219.44 339.6,253.34 354.43,268.17 354.43,272.86 355.35,273.78 D1.2 365.59,273.78 366.51,272.86 366.51,270.55 370.04,267.02 381.7,267.02 396.5,281.82 396.5,502.15 417.82,523.47 432.59,523.47 438.37,529.25 U1.16
USBCON1_P: D1.1 J1.3 U1.15 | length 623.3
  L1 w6.03: J1.3 164.86,223.68 186.17,223.68 187.09,224.6 228.36,224.6 267.06,185.89 325.89,185.89 353.63,213.63 353.63,241.77 354.43,242.57 354.43,245.3 355.35,246.22 D1.1 365.59,246.22 366.51,247.14 366.51,249.45 370.04,252.99 387.51,252.99 410.53,276.01 410.53,496.34 423.63,509.44 432.59,509.44 438.37,503.66 U1.15
VUSB: C6.1 D2.2 D6.1 J1.1 | length 399
  L1 w20: D2.2 110,442.44 211.81,340.63 D6.1 250,290 230,270 J1.1 ; D6.1@250,341.2 250.16,341.36 309.27,341.36 C6.1
ZCD: U2.8 U3.5 | length 2081.6
  L1 w10: U2.8 535.59,994.41 v1(580,950)
  L4 w10: v1(580,950) 621.82,950 881.82,690 2100,690 2316.19,473.81 2346.19,473.81 U3.5
pads on no net: HS1.1 HS1.2 J1.4 J1.P$1 J1.P$2 J1.P$8 J1.P$9 J1.P$10 J1.P$11 J1.P$12 J1.P$13 OPTO1.3_NC OPTO1.5_TRIAC_SUB U1.6 U1.8 U1.9 U1.10 U1.11 U1.12 U1.13 U1.14 U1.17 U1.19 U1.22 U1.23 U1.24 U1.27 U1.28 U2.6 U2.7 U2.9 U2.12 U2.13 U2.14 U2.15 U2.16 U2.17 U2.20 U2.21 U2.22 U2.23 U2.24 U2.25 U2.26 U2.27 U2.28 U2.29 U2.30 U2.31 U2.32 U2.33 U2.34 U2.35 U2.36 U2.37 U2.38 U2.41 U2.44 U3.3 U3.6 U5.4
copper on no net:
  other v2: 70,3980 5950,3980

## Polygon pours and split planes (outlines as drawn)
GND on L1 "NONET_L-01_P-001" (solid, remove dead copper, pour order 1): 50,2840 60,2840 1090,2840 1090,1760 1600,1250 1590,50 1550,20 1540,20 40,20 10,50
+3V3 on L1 "NONET_L-01_P-001" (solid, remove dead copper, pour order 0): 360,2120 500,2130 500,2020 360,2030
GND on L4 "NONET_L-01_P-001" (solid, remove dead copper, pour order 2): 50,2840 1150,2840 1150,1700 1600,1250 1590,50 1560,20 40,20 20,40 20,1570

## Other copper
L1:
  pour cut-out: 1160,2840 980,2840 980,2400 1090,2290 1090,2100 1110,2080 1100,2070 1100,1690 1150,1690 1160,1690
  pour cut-out: 0,1660 240,1660 240,980 0,980
L4:
  pour cut-out: 980,2840 970,2830 970,2220 1060,2220 1080,2200 1080,1690 1100,1670 1160,1670 1160,2840
  pour cut-out: 0,1660 240,1660 240,980 0,980

## Silkscreen, mask and mechanical layers (free items; w line width, h text height)
Top Overlay:
  drawing of 2 lines, arcs and shapes, not listed
  text "AC MAINS" at 4529.86,3231.8 h150
  text "LOAD 1" at 5223.2,2655 h150 r90
  text "LOAD 2" at 5213.2,1955 h150 r90
  text "LOAD 3" at 5213.2,1095 h150 r90
  text "LOAD 4" at 5213.2,325 h150 r90
Top Solder:
  drawing of 108 lines, arcs and shapes, not listed
Mechanical 1:
  the board outline again, w10

## Text inside footprints (layer, text, board x,y; h text height)
J1: Mechanical 13 "PCB Edge" at -2.4,47.56 h10 r270